# Altium PCB Prototype_REV1.PcbDoc
Units mm, origin at the board's own origin, x right, y up, seen from the top; angles counter-clockwise.
Board outline 90 x 25 mm, 2 copper layers (Top Layer, Bottom Layer); 121 components, 71 nets, 416 pads, 3 vias.
Unrouted connection lines stored in the file: 229.
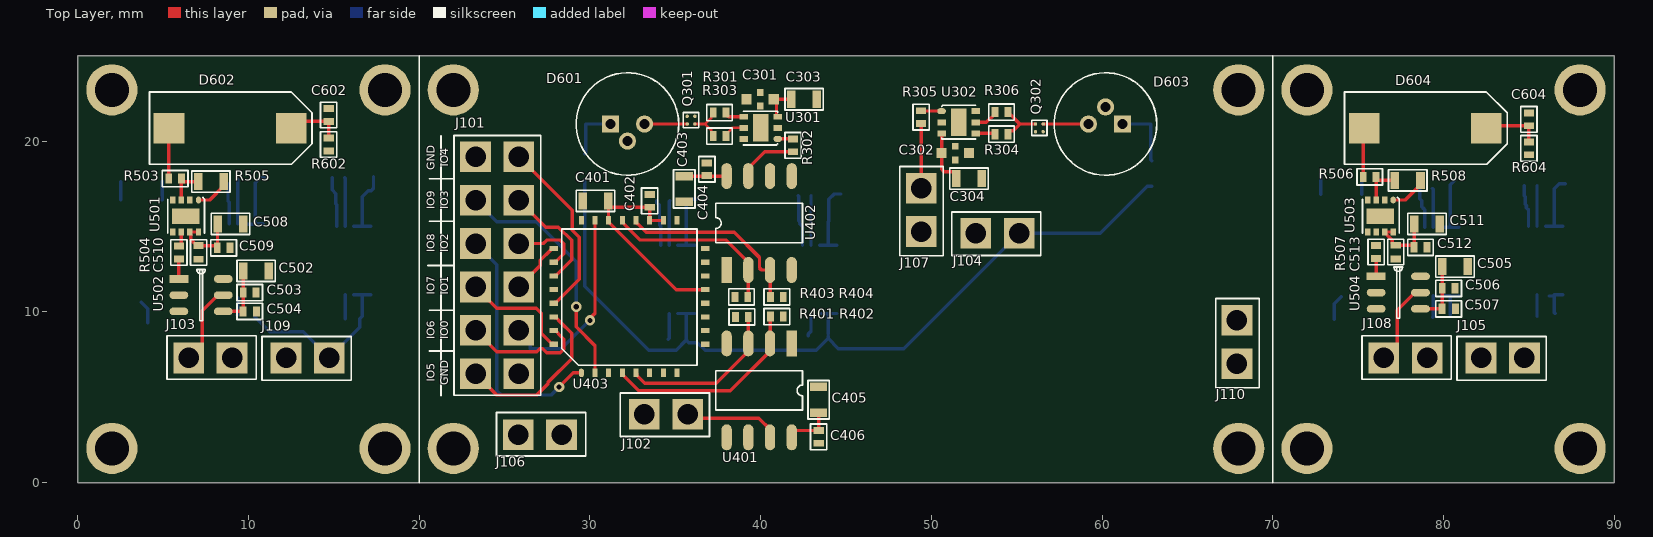
[diagram p0: Top Layer view]
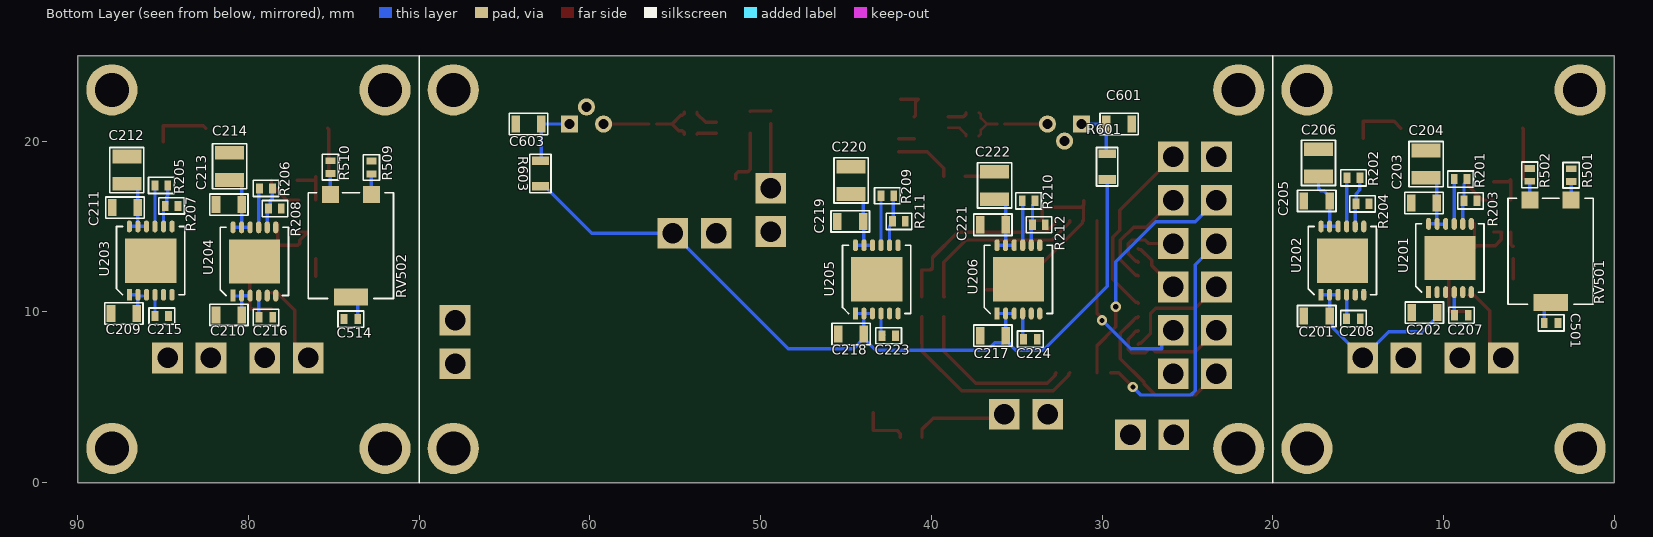
[diagram p1: Bottom Layer view, seen from below]

## Layer stack, top to bottom
Top Solder: solder mask 0.0102, Solder Resist, Dk 3.5
Top Layer: signal copper 0.0356
Dielectric 1: dielectric 0.32, FR-4, Dk 4.8
Bottom Layer: signal copper 0.0356
Bottom Solder: solder mask 0.0102, Solder Resist, Dk 3.5

## Board outline
0,0 90,0 90,25 0,25

## Design rules (kind name [scope] priority, off if disabled: settings)
Clearance Clearance_1 [All] p1: gap=0.254 ignorepadtopadclearanceinfootprint=FALSE
Clearance [All] p2: gap=0.254 ignorepadtopadclearanceinfootprint=FALSE
PolygonConnect [All] p1: connectstyle=Relief reliefconductorwidth=0.254 reliefentries=4 polygonreliefangle="90 Angle" airgapwidth=0.254
RoutingVias [All] p1: holewidth=0.3 width=0.6 viastyle="Through Hole" minholewidth=0.1 minwidth=0.3 maxholewidth=0.6 maxwidth=0.7
SolderMaskExpansion [All] p1: expansion=0 istentingtop=FALSE
SupplyNets "Schematic Supply Nets_5" [InNet('3V3')] p1: voltage=0.000
SupplyNets "Schematic Supply Nets_4" [InNet('Vvar')] p2: voltage=0.000
SupplyNets "Schematic Supply Nets_3" [InNet('5VGaN')] p3: voltage=0.000
SupplyNets "Schematic Supply Nets_2" [InNet('Vin')] p4: voltage=0.000
SupplyNets "Schematic Supply Nets_1" [InNet('5V')] p5: voltage=0.000
SupplyNets "Schematic Supply Nets" [InNet('GND')] p6: voltage=0.000
Width [All] p1: maxlimit=1 minlimit=0.1 preferedwidth=0.2
30 further rules are at their usual default settings.

## Classes and differential pairs
component class Time_Delay: C401 C402 C403 C404 C405 C406 R401 R402 R403 R404 U401 U402 U403
component class Power_Supply: C202 C213 C214 C215 C216 C217 C218 C219 C220 C221 C222 C223 C224 R201 R207 R208 R209 R210 R211 R212 U201 U204 U205 U206
component class Light_Detection: C501 C502 C503 C504 C505 C506 C507 C508 C509 C510 C511 C512 C513 C514 R501 R502 R503 R504 R505 R506 R507 R508 R509 R510 RV501 RV502 U501 U502 U503 U504
component class Laser_System: C601 C602 C603 C604 D601 D602 D603 D604 R601 R602 R603 R604
component class Laser_Driver: C301 C302 C303 C304 Q301 Q302 R301 R302 R303 R304 R305 R306 U301 U302
component class Inputs_Outputs: J101 J102 J103 J104 J107 J109 J110

## Components (designator, comment, footprint, x,y, rotation, side; value= is the part's Value field where it differs from the comment)
C201 "1uF" "1uF 0603" 17.425,9.75 r180 bottom
C202 "1uF" "1uF 0603" 11.125,9.95 r180 bottom
C203 "1uF" "1uF 0603" 11.15,16.375 r180 bottom
C204 "10uF" "10uF 0805" 11.025,18.65 r270 bottom
C205 "1uF" "1uF 0603" 17.425,16.5 r180 bottom
C206 "10uF" "10uF 0805" 17.325,18.725 r270 bottom
C207 "10nF" "10nF 0402" 8.95,9.8 r0 bottom
C208 "10nF" "10nF 0402" 15.275,9.6 r0 bottom
C209 "1uF" "1uF 0603" 87.3,9.9 r180 bottom
C210 "1uF" "1uF 0603" 81.15,9.825 r180 bottom
C211 "1uF" "1uF 0603" 87.225,16.1 r180 bottom
C212 "10uF" "10uF 0805" 87.125,18.3 r270 bottom
C213 "1uF" "1uF 0603" 81.15,16.275 r180 bottom
C214 "10uF" "10uF 0805" 81.1,18.525 r270 bottom
C215 "10nF" "10nF 0402" 85.075,9.75 r0 bottom
C216 "10nF" "10nF 0402" 78.975,9.675 r0 bottom
C217 "1uF" "1uF 0603" 36.4,8.6 r180 bottom
C218 "1uF" "1uF 0603" 44.7,8.7 r180 bottom
C219 "1uF" "1uF 0603" 44.75,15.3 r180 bottom
C220 "10uF" "10uF 0805" 44.7,17.7 r270 bottom
C221 "1uF" "1uF 0603" 36.4,15.1 r180 bottom
C222 "10uF" "10uF 0805" 36.3,17.4 r270 bottom
C223 "10nF" "10nF 0402" 42.5,8.6 r0 bottom
C224 "10nF" "10nF 0402" 34.2,8.4 r0 bottom
C301 "100n FT" "100n FT 0603" 39.175,22.45 r0 top
C302 "100n FT" "100n FT 0603" 52.2,19.3 r180 top
C303 "1uF" "1uF 0603" 42.55,22.45 r180 top
C304 "1uF" "1uF 0603" 52.2,17.8 r180 top
C401 "1uF" "1uF 0603" 30.325,16.5 r0 top
C402 "100nF" "100nF 0402" 33.5,16.5 r270 top
C403 "1uF" "1uF 0603" 35.525,17.2 r90 top
C404 "100nF" "100nF 0402" 36.85,18.35 r270 top
C405 "1uF" "1uF 0603" 43.4,4.85 r270 top
C406 "100nF" "100nF 0402" 43.4,2.675 r90 top
C501 "10nF" "10nF 0402" 3.7,9.35 r0 bottom
C502 "1uF" "1uF 0603" 10.45,12.4 r180 top locked
C503 "100nF" "100nF 0402" 10.075,11.125 r180 top locked
C504 "10nF" "10nF 0402" 10.075,10.025 r180 top locked
C505 "1uF" "1uF 0603" 80.675,12.65 r180 top locked
C506 "100nF" "100nF 0402" 80.3,11.375 r180 top locked
C507 "10nF" "10nF 0402" 80.3,10.175 r180 top locked
C508 "1uF" "1uF 0603" 8.95,15.15 r180 top locked
C509 "100nF" "100nF 0402" 8.55,13.75 r180 top locked
C510 "10nF" "10nF 0402" 7.075,13.475 r90 top locked
C511 "1uF" "1uF 0603" 79.025,15.15 r180 top locked
C512 "100nF" "100nF 0402" 78.65,13.775 r180 top locked
C513 "10nF" "10nF 0402" 77.2,13.5 r90 top locked
C514 "10nF" "10nF 0402" 74,9.575 r180 bottom
C601 "2.2nF" "2.2nF 0603" 29,21 r0 bottom
C602 "100nF" "100nF 0402" 14.7,21.525 r270 top
C603 "2.2nF" "2.2nF 0603" 63.6,21 r180 bottom
C604 "100nF" "100nF 0402" 85,21.275 r270 top
D601 "PLT5 450GB" "PLT5 450GB" 31.2,21 r0 top
D602 "VBP104S" VBP104S 8.925,20.75 r0 top locked
D603 "PLT5 450GB" "PLT5 450GB" 61.2,21 r180 top
D604 "VBP104S" VBP104S 78.925,20.75 r0 top locked
J101 "Spikelinis conectorius" "12PIN HEADER STRIP" 25.84,20.33 r180 top
J102 "Spikelinis conectorius" "2Pin header strip" 35.725,4 r270 top
J103 "Spikelinis conectorius" "2Pin header strip" 6.5,7.3 r90 top locked
J104 "Spikelinis conectorius" "2Pin header strip" 55.14,14.6 r270 top
J105 "Spikelinis conectorius" "2Pin header strip" 84.74,7.3 r270 top locked
J106 "Spikelinis conectorius" "2Pin header strip" 25.8,2.8 r90 top
J107 "Spikelinis conectorius" "2Pin header strip" 49.4,17.24 r0 top
J108 "Spikelinis conectorius" "2Pin header strip" 76.5,7.3 r90 top locked
J109 "Spikelinis conectorius" "2Pin header strip" 14.74,7.3 r270 top locked
J110 "Spikelinis conectorius" "2Pin header strip" 67.9,9.5 r0 top
Q301 "EPC2036" EPC2036 36.15,21 r180 top
Q302 "EPC2036" EPC2036 56.1,21 r0 top
R201 "47K5" "47.5k 0402" 9,17.775 r0 bottom
R202 "23K2" "23.2k 0402" 15.275,17.85 r180 bottom
R203 "15k" "15k 0402" 8.425,16.5 r0 bottom
R204 "13K3" "13k3 0402" 14.75,16.325 r0 bottom
R205 "47K5" "47.5k 0402" 85.1,17.4 r0 bottom
R206 "23K2" "23.2k 0402" 78.975,17.225 r180 bottom
R207 "15k" "15k 0402" 84.5,16.2 r0 bottom
R208 "13K3" "13k3 0402" 78.45,16.05 r0 bottom
R209 "47K5" "47.5k 0402" 42.575,16.8 r0 bottom
R210 "23K2" "23.2k 0402" 34.3,16.5 r180 bottom
R211 "15k" "15k 0402" 41.9,15.3 r0 bottom
R212 "13K3" "13k3 0402" 33.7,15.1 r0 bottom
R301 "2R2" "2R2 0402" 37.6,21.675 r180 top
R302 "22R" "22R 0402" 41.9,19.75 r270 top
R303 "1R" "1R 0402" 37.6,20.3 r180 top
R304 "2R2" "2R2 0402" 54.1,20.4 r0 top
R305 "22R" "22R 0402" 49.4,21.4 r270 top
R306 "1R" "1R 0402" 54.1,21.7 r0 top
R401 "200R" "200R 0402" 38.9,9.7 r0 top
R402 "200R" "200R 0402" 40.95,9.725 r180 top
R403 "200R" "200R 0402" 38.875,10.875 r0 top
R404 "200R" "200R 0402" 40.95,10.875 r180 top
R501 "100R" "100R 0402" 2.525,18 r270 bottom
R502 "3K3" "3k3 0402" 4.95,18.025 r90 bottom
R503 "10R" "10R 0402" 5.7,17.8 r0 top locked
R504 "100R" "100R 0402" 5.925,13.475 r270 top locked
R505 "1K" "1k 0603" 7.8,17.625 r0 top locked
R506 "10R" "10R 0402" 75.671,17.897 r0 top locked
R507 "100R" "100R 0402" 76.05,13.5 r270 top locked
R508 "1K" "1k 0603" 77.9,17.7 r0 top locked
R509 "100R" "100R 0402" 72.8,18.45 r270 bottom
R510 "3K3" "3k3 0402" 75.2,18.475 r90 bottom
R601 "1K" "1k 0603" 29.7,18.5 r270 bottom
R602 "100R" "100R 0402" 14.7,19.8 r90 top
R603 "1K" "1k 0603" 62.9,18.1 r270 bottom
R604 "100R" "100R 0402" 85,19.575 r270 top
RV501 "5K TRIM" "5K TRIM" 3.725,13.55 r0 bottom
RV502 "5K TRIM" "5K TRIM" 74,13.875 r0 bottom
U201 "LP38798SD-ADJ/NOPB" LP38798SD-ADJ/NOPB 10.875,11.15 r90 bottom
U202 "LP38798SD-ADJ/NOPB" LP38798SD-ADJ/NOPB 17.175,11 r90 bottom
U203 "LP38798SD-ADJ/NOPB" LP38798SD-ADJ/NOPB 86.975,11 r90 bottom
U204 "LP38798SD-ADJ/NOPB" LP38798SD-ADJ/NOPB 80.9,10.95 r90 bottom
U205 "LP38798SD-ADJ/NOPB" LP38798SD-ADJ/NOPB 44.45,9.9 r90 bottom
U206 "LP38798SD-ADJ/NOPB" LP38798SD-ADJ/NOPB 36.15,9.9 r90 bottom
U301 "LMG1025QDEERQ1" LMG1025QDEERQ1 41,20.125 r180 top
U302 "LMG1025QDEERQ1" LMG1025QDEERQ1 50.6,21.75 r0 top
U401 "MC100EPT20DR2G" MC100EPT20DR2G 41.82,8.15 r270 top
U402 "MC100EPT21DR2G" MC100EPT21DR2G 38.01,12.45 r90 top
U403 "MC100EP195FAG" MC100EP195FAG 29.5,6.425 r90 top
U501 "OPA855IDSGT" OPA855IDSGT 7.075,16.55 r270 top locked
U502 "TLV3501AIDBVT" TLV3501AIDBVT 5.925,11.925 r0 top locked
U503 "OPA855IDSGT" OPA855IDSGT 77.05,16.55 r270 top locked
U504 "TLV3501AIDBVT" TLV3501AIDBVT 76.05,12.075 r0 top locked

## Footprints (in the part's own frame and the unit in brackets; to place one, negate y for a bottom-side part, rotate by r counter-clockwise, add the part's x,y. Pads: shape width x height; smd on the part's side, far side on the other; paste and mask are expansions set on the pad)
"1k 0603" [mm] "ERA-3AEB102V"
  rect 0.5x1 smd: 1(-0.75,0) 2(0.75,0)
  silkscreen extent -1.13,-0.63 1.12,0.63, body extent -0.8,-0.4 0.8,0.4, height 0.46
"1R 0402" [mm] "CRT0402-FZ-1R00GLF"
  rect 0.4x0.6 smd: 1(-0.371,0.003) 2(0.379,0.003)
  silkscreen extent -0.75,-0.47 0.75,0.48, body extent -0.5,-0.25 0.5,0.25, height 0.36
"1uF 0603" [mm] "CGA3E1X7R1E105K080AC"
  rect 0.5x1 smd: 1(-0.75,0) 2(0.75,0)
  silkscreen extent -1.13,-0.63 1.12,0.63, body extent -0.8,-0.4 0.8,0.4, height 0.81
"2.2nF 0603" [mm]
  rect 0.5x1 smd: 1(-0.75,0) 2(0.75,0)
  silkscreen extent -1.13,-0.63 1.12,0.63, body extent -0.87,-0.48 0.87,0.48, height 0.88
"2Pin header strip" [mm]
  rect 1.8x1.8 hole 1.2: 1(0,0) 2(0,-2.54)
  silkscreen extent -1.25,-3.95 1.3,1.28, body extent -1.24,-3.94 1.3,1.26, height 9.28
"2R2 0402" [mm] "CRT0402-FZ-2R00GLF"
  rect 0.4x0.6 smd: 1(-0.371,0.003) 2(0.379,0.003)
  silkscreen extent -0.75,-0.47 0.75,0.48, body extent -0.5,-0.25 0.5,0.25, height 0.36
"3k3 0402" [mm] "ERJ-U02F3301X"
  rect 0.4x0.6 smd: 1(-0.375,0) 2(0.375,0)
  silkscreen extent -0.75,-0.48 0.75,0.48, body extent -0.5,-0.25 0.5,0.25, height 0.36
"5K TRIM" [mm] "3314G-1-502E"
  rect 1x1 smd: 1(-1.2,-3) 3(1.2,-3)
  rect 2x1 smd: 2(0,3)
  silkscreen extent -2.5,-3.1 2.5,3.1, body extent -2.5,-3.1 2.5,3.1, height 2.74
"10nF 0402" [mm] "C0402C103J5RACTU"
  rect 0.4x0.6 smd: 1(-0.4,0) 2(0.4,0)
  silkscreen extent -0.75,-0.48 0.75,0.48, body extent -0.53,-0.27 0.53,0.28, height 0.56
"10R 0402" [mm] "CRT0402-DZ-10R0GLF"
  rect 0.4x0.6 smd: 1(-0.371,0.003) 2(0.379,0.003)
  silkscreen extent -0.75,-0.47 0.75,0.48, body extent -0.5,-0.25 0.5,0.25, height 0.36
"10uF 0805" [mm] "GRJ21BR61E106KE01K"
  rect 0.8x1.7 smd: 1(-0.8,0) 2(0.8,0)
  silkscreen extent -1.33,-1 1.33,1, body extent -1,-0.72 1,0.72, height 1.26
"12PIN HEADER STRIP" [mm] "TSW-112-07-G-S"
  rect 1.8x1.8 hole 1.2: 1(0,13.95) 2(0,11.41) 3(0,8.87) 4(0,6.33) 5(0,3.79) 6(0,1.25) 7(2.54,13.95) 8(2.54,11.41) 9(2.54,8.87) 10(2.54,6.33) 11(2.54,3.79) 12(2.54,1.25)
  silkscreen extent -1.28,0 3.8,15.22
"13k3 0402" [mm] "CRCW040213K3FKED"
  rect 0.4x0.6 smd: 1(-0.375,0) 2(0.375,0)
  silkscreen extent -0.75,-0.48 0.75,0.48, body extent -0.5,-0.25 0.5,0.25, height 0.36
"15k 0402" [mm] "CRCW040215K0FKED"
  rect 0.4x0.6 smd: 1(-0.375,0) 2(0.375,0)
  silkscreen extent -0.75,-0.48 0.75,0.48, body extent -0.5,-0.25 0.5,0.25, height 0.36
"22R 0402" [mm] "ERA-2AKD220X"
  rect 0.4x0.6 smd: 1(-0.375,0) 2(0.375,0)
  silkscreen extent -0.75,-0.48 0.75,0.48, body extent -0.5,-0.25 0.5,0.25, height 0.36
"23.2k 0402" [mm] "CR0402-FX-2322GLF"
  rect 0.4x0.6 smd: 1(-0.375,0) 2(0.375,0)
  silkscreen extent -0.75,-0.48 0.75,0.48, body extent -0.5,-0.25 0.5,0.25, height 0.36
"47.5k 0402" [mm] "CR0402-FX-4752GLF"
  rect 0.4x0.6 smd: 1(-0.375,0) 2(0.375,0)
  silkscreen extent -0.75,-0.48 0.75,0.48, body extent -0.5,-0.25 0.5,0.25, height 0.36
"100n FT 0603" [mm] "NFM18PC104R1C3D"
  rect 0.6x0.6 smd: 1(0,0) 3(1.6,0)
  rect 0.4x0.4 smd: A2(0.8,-0.4) B2(0.8,0.4)
  body extent 0.02,-0.4 1.63,0.4, height 0.61
"100nF 0402" [mm] "C1005X7R1E104K050BB"
  rect 0.4x0.6 smd: 1(-0.375,0) 2(0.375,0)
  silkscreen extent -0.75,-0.48 0.75,0.48, body extent -0.48,-0.25 0.53,0.25, height 0.51
"100R 0402" [mm] "ERA-2VEB1000X"
  rect 0.4x0.6 smd: 1(-0.375,0) 2(0.375,0)
  silkscreen extent -0.75,-0.48 0.75,0.48, body extent -0.5,-0.25 0.5,0.25, height 0.37
"200R 0402" [mm] "ERA-2AED201X"
  rect 0.4x0.6 smd: 1(-0.375,0) 2(0.375,0)
  silkscreen extent -0.75,-0.48 0.75,0.48, body extent -0.5,-0.25 0.5,0.25, height 0.36
EPC2036 [mm]
  round 0.2 smd: 1(0,0) 2(0,-0.45) 3(0.45,0) 4(0.45,-0.45)
  silkscreen extent -0.23,-0.67 0.67,0.23, body extent -0.22,-0.67 0.67,0.22, height 0.93
LMG1025QDEERQ1 [mm]
  oval 0.5x0.35 smd: 1(0,0)
  rect 0.5x0.35 smd: 2(0,-0.65) 3(0,-1.3) 4(2,-1.3) 5(2,-0.65) 6(2,0)
  rect 0.9x1.6 smd: 7(1,-0.65)
  silkscreen extent 0,-1.63 2,0.35, body extent 0,-1.65 2,0.35, height 0.79
LP38798SD-ADJ/NOPB [mm]
  rect 0.7x0.3 smd: 1(0,0)
  oval 0.7x0.3 smd: 2(0,-0.5) 3(0,-1) 4(0,-1.5) 5(0,-2) 6(0,-2.5) 7(4,-2.5) 8(4,-2) 9(4,-1.5) 10(4,-1) 11(4,-0.5) 12(4,0)
  rect 2.6x3 smd: 13(2,-1.25)
  silkscreen extent 0,-3.25 4,0.75, body extent 0,-3.25 4,0.75, height 0.99
MC100EP195FAG [mm]
  oval 0.5x0.3 smd: 1(0,0)
  rect 0.5x0.3 smd: 2(0,-0.8) 3(0,-1.6) 4(0,-2.4) 5(0,-3.2) 6(0,-4) 7(0,-4.8) 8(0,-5.6) 17(8.925,-5.6) 18(8.925,-4.8) 19(8.925,-4) 20(8.925,-3.2) 21(8.925,-2.4) 22(8.925,-1.6) 23(8.925,-0.8) 24(8.925,0)
  rect 0.3x0.5 smd: 9(1.675,-7.25) 10(2.475,-7.25) 11(3.275,-7.25) 12(4.075,-7.25) 13(4.875,-7.25) 14(5.675,-7.25) 15(6.475,-7.25) 16(7.275,-7.25) 25(7.275,1.625) 26(6.475,1.625) 27(5.675,1.625) 28(4.875,1.625) 29(4.075,1.625) 30(3.275,1.625) 31(2.475,1.625) 32(1.675,1.625)
  silkscreen extent 0.45,-6.78 8.42,1.15, body extent -0.03,-7.3 8.98,1.7, height 1.61
MC100EPT20DR2G [mm]
  rect 1.52x0.6 smd: 1(0,0)
  oval 1.52x0.6 smd: 2(0,-1.27) 3(0,-2.54) 4(0,-3.81) 5(5.5,-3.81) 6(5.5,-2.54) 7(5.5,-1.27) 8(5.5,0)
  silkscreen extent 1.59,-4.44 3.91,0.64, body extent -0.22,-4.38 5.77,0.53, height 1.76
MC100EPT21DR2G [mm]
  rect 1.52x0.6 smd: 1(0,0)
  oval 1.52x0.6 smd: 2(0,-1.27) 3(0,-2.54) 4(0,-3.81) 5(5.5,-3.81) 6(5.5,-2.54) 7(5.5,-1.27) 8(5.5,0)
  silkscreen extent 1.59,-4.44 3.91,0.64, body extent -0.22,-4.38 5.77,0.53, height 1.76
OPA855IDSGT [mm]
  oval 0.4x0.32 smd: 1(0,0)
  rect 0.4x0.32 smd: 2(0,-0.5) 3(0,-1) 4(0,-1.5) 5(1.875,-1.5) 6(1.875,-1) 7(1.875,-0.5) 8(1.875,0)
  rect 0.9x1.6 smd: 9(0.95,-0.75)
  silkscreen extent -0.15,-1.8 1.95,0.35, body extent -0.05,-1.75 1.95,0.25, height 0.79
"PLT5 450GB" [mm]
  rect 1x1 / inner rect 1.8x1.8 / far side rect 1x1 hole 0.6: 1(0,0)
  round 1 / inner rect 1.8x1.8 / far side round 1 hole 0.6: 2(1,-1) 3(2,0)
  silkscreen extent -2,-3 4,3, body extent -1.78,-2.73 3.75,2.78, height 3.51
TLV3501AIDBVT [mm]
  rect 1.1x0.45 smd: 1(0,0)
  oval 1.1x0.45 smd: 2(0,-0.95) 3(0,-1.9) 4(2.6,-1.9) 5(2.6,-0.95) 6(2.6,0)
  silkscreen extent 1.05,-2.45 1.55,0.55, body extent 0,-2.4 2.8,0.5, height 1.11
VBP104S [mm]
  rect 1.8x1.8 smd: 1(-3.575,0) 2(3.575,0)
  silkscreen extent -4.72,-2.1 4.8,2.12, body extent -3.45,-1.94 2.95,1.96, height 1.31

## Part data
C201 C202 C203 C205 C209 C210 C211 C213 C217 C218 C219 C221 C303 C304 C401 C403 C405 C502 C505 C508 C511: library part "1uF 0603", "CGA3E1X7R1E105K080AC"
C204 C206 C212 C214 C220 C222: library part "10uF 0805", "GRJ21BR61E106KE01K"
C207 C208 C215 C216 C223 C224 C501 C504 C507 C510 C513 C514: library part "10nF 0402", "C0402C103J5RACTU"
C301 C302: library part "100n 0603 FT", "NFM18PC104R1C3D"
C402 C404 C406 C503 C506 C509 C512 C602 C604: library part "100n 0402", "C1005X7R1E104K050BB"
C601 C603: library part "2.2nF 0603", "C0603X222K1REC7411"
D601 D603: "Lazeris"
D602 D604: "FotoDiodas"
J101: library part 12PinConnector, "TSW-112-07-G-S"
J102 J103 J104 J105 J106 J107 J108 J109 J110: library part 2PinConnector
R201 R205 R209: library part "47K5 0402", "CR0402-FX-4752GLF"
R202 R206 R210: library part "23K2 0402", "CR0402-FX-2322GLF"
R203 R207 R211: library part "15k 0402", "CRCW040215K0FKED"
R204 R208 R212: library part "13K3 0402", "CRCW040213K3FKED"
R301 R304: library part "2R2 0402", "CRT0402-FZ-2R00GLF"
R302 R305: library part "22R 0402", "ERA-2AKD220X"
R303 R306: library part "1R 0402", "CRT0402-FZ-1R00GLF"
R401 R402 R403 R404: library part "200R 0402", "ERA-2AED201X"
R501 R504 R507 R509 R602 R604: library part "100R 0402", "ERA-2VEB1000X"
R502 R510: library part "3K3 0402", "ERJ-U02F3301X"
R503 R506: library part "10R 0402", "CRT0402-DZ-10R0GLF"
R505 R508 R601 R603: library part "1K 0603", "ERA-3AEB102V"
RV501 RV502: "3314G-1-502E"
U201 U202 U203 U204 U205 U206: "input 3-20V output 1.5-5V"
U301 U302: "GaN Driver"
U501 U503: "OP ampas"
U502 U504: "Comparatorius"

## Free pads (board coordinates)
  round 3 hole 2: 2(2,2) 2(2,23) 2(18,2) 2(18,23) 2(22,2) 2(22,23) 2(68,2) 2(68,23) 2(72,2) 2(72,23) 2(88,2) 2(88,23)

## Via types
v1: diameter 0.6, hole 0.3, Top Layer to Bottom Layer, 3 vias

## Nets (pads, with @x,y where several pads share a name; then routed paths per layer and width w, separated by ;. In a path a pad name is that pad's centre, name@x,y a point inside that pad or via, vN(x,y) a via of type N, cw(c..) or ccw(c..) an arc to the next point about the centre after c; other vN are vias at no path point)
3V3: C205.2 C206.2 C213.2 C214.2 C221.2 C222.2 C401.2 C402.2 C403.2 C404.2 C405.2 C406.2 C502.2 C503.2 C504.2 C505.2 C506.2 C507.2 R501.1 R509.1 U202.10 U202.11 U202.12 U204.10 U204.11 U204.12 U206.10 U206.11 U206.12 U401.8 U402.8 U403.13 U403.18 U403.19 U403.22 U501.4 U502.4 U503.4 U504.4 | length 37.8
  Top Layer w0.2: U502.4 C504.2 9.687,10.038 9.687,11.112 C503.2 C502.2 ; U403.18 U403.19 C402.2 31.225,16.125 31.075,16.275 C401.2 31.087,16.488 31.087,15.362 U403.22 31.15,15.3 31.15,15.199 35.049,11.3 U403.13 ; C403.2 U402.8 ; U401.8 41.82,2.865 42.005,3.05 C406.2 C405.2 ; U504.4 C507.2 79.912,10.187 79.912,11.362 C506.2 C505.2
  Bottom Layer w0.2: U202.10 U202.11 ; U202.12 U202.11 ; C206.2 17.325,17.225 17.184,17.084 17.009,17.084 16.675,16.75 C205.2 U202.11 ; U206.10 U206.11 ; U206.12 U206.11 ; C222.2 35.95,16.6 35.65,16.3 C221.2 U206.11 ; U204.10 U204.11 ; C214.2@80.65,17.7 80.4,17.45 C213.2 U204.11 ; U204.12 U204.11
5V: C203.2 C204.2 C211.2 C212.2 C508.2 C509.2 C510.2 C511.2 C512.2 C513.2 R602.1 R604.2 U201.10 U201.11 U201.12 U203.10 U203.11 U203.12 U501.7 U501.8 U503.7 U503.8 | length 16.4
  Top Layer w0.2: U501.8 U501.7 6.615,14.635 6.615,14.235 6.975,13.875 C510.2 8.075,13.875 8.175,13.775 C509.2 8.187,13.762 8.187,15.138 C508.2 ; U503.7@76.55,14.635 77,14.185 77,14 77.1,13.9 C513.2 78.175,13.9 78.275,13.8 C512.2 C511.2 ; U503.7 U503.8
  Bottom Layer w0.2: U201.10 9.9,15.125 10.35,15.125 U201.11 ; U201.12 10.4,15.15 10.388,15.162 10.388,16.363 C203.2 10.4,17.55 10.7,17.85 C204.2 ; U203.10 U203.11 ; U203.12 U203.11 ; C212.2 86.775,17.5 86.475,17.2 C211.2 U203.11
5VGaN: C219.2 C220.2 C301.3 C302.3 C303.2 C304.2 U205.10 U205.11 U205.12 U301.3 U302.3 | length 10
  Top Layer w0.2: U301.3 40.927,21.498 40.927,22.298 C301.3 C303.2 ; U302.3 C302.3 50.6,18.341 50.741,18.2 51.3,18.2 51.45,18.05 C304.2
  Bottom Layer w0.2: U205.10 U205.11 ; U205.12 U205.11 ; C220.2 44.3,16.9 44,16.6 C219.2 43.969,15.269 43.969,13.919 U205.11
DelayLaserAnode: C601.2 D601.1 R601.1 | length 3.2
  Bottom Layer w0.2: R601.1 29.75,19.3 C601.2 D601.1
EtalonLaserAnode: C603.2 D603.1 R603.1 | length 3.8
  Bottom Layer w0.2: D603.1 C603.2 62.85,18.9 R603.1
GND: C201.1 C202.1 C203.1 C204.1 C205.1 C206.1 C207.1 C208.1 C209.1 C210.1 C211.1 C212.1 C213.1 C214.1 C215.1 C216.1 C217.1 C218.1 C219.1 C220.1 C221.1 C222.1 C223.1 C224.1 C301.1 C301.A2 C301.B2 C302.1 C302.A2 C302.B2 C303.1 C304.1 C401.1 C402.1 C403.1 C404.1 C405.1 C406.1 C501.1 C502.1 C503.1 C504.1 C505.1 C506.1 C507.1 C508.1 C509.1 C510.1 C511.1 C512.1 C513.1 C514.1 C601.1 C602.1 C603.1 C604.1 D601.2 D603.2 J101.1 J101.12 J102.2 J103.2 J104.2 J105.2 J106.1 J106.2 J107.2 J108.2 J109.2 J110.1 J110.2 pad.2 Q301.2 Q301.4 Q302.2 Q302.4 R203.1 R204.1 R207.1 R208.1 R211.1 R212.1 R401.1 R402.1 R403.1 R404.1 R502.2 R510.2 U201.6 U201.7 U201.13 U202.6 U202.7 U202.13 U203.6 U203.7 U203.13 U204.6 U204.7 U204.13 U205.6 U205.7 U205.13 U206.6 U206.7 U206.13 U301.2 U301.6 U301.7 U302.2 U302.6 U302.7 U401.5 U402.5 U403.9 U403.24 U403.28 U501.5 U501.9 U502.2 U502.6 U503.5 U503.9 U504.2 U504.6
NetC207_2: C207.2 U201.4 | length 1
  Bottom Layer w0.2: C207.2 9.375,9.825 9.375,10.746 9.379,10.75 U201.4@9.379,10.825
NetC208_2: C208.2 U202.4 | length 1.4
  Bottom Layer w0.2: C208.2 U202.4
NetC215_2: C215.2 U203.4 | length 1.2
  Bottom Layer w0.2: C215.2 U203.4
NetC216_2: C216.2 U204.4 | length 1.3
  Bottom Layer w0.2: C216.2 79.4,9.7 U204.4
NetC223_2: C223.2 U205.4 | length 1.4
  Bottom Layer w0.2: C223.2@42.8,8.6 42.8,8.7 42.95,8.85 U205.4
NetC224_2: C224.2 U206.4 | length 1.5
  Bottom Layer w0.2: C224.2 34.65,8.45 U206.4
NetC602_2: C602.2 D602.2 R602.2 | length 3.3
  Top Layer w0.2: D602.2 12.9,21.15 C602.2 R602.2
NetC604_2: C604.2 D604.2 R604.1 | length 3.5
  Top Layer w0.2: D604.2 82.65,20.9 C604.2 R604.1
NetD601_3: D601.3 Q301.3 | length 2.5
  Top Layer w0.2: D601.3 Q301.3
NetD602_1: D602.1 R503.1 | length 3
  Top Layer w0.2: R503.1 5.329,20.729 D602.1
NetD603_3: D603.3 Q302.3 | length 2.6
  Top Layer w0.2: Q302.3 D603.3
NetD604_1: D604.1 R506.1 | length 2.9
  Top Layer w0.2: R506.1 75.3,20.7 D604.1
NetJ101_2: J101.2 U403.23 | length 11.5
  Top Layer w0.2: v1(30,9.5) 30,9.608 30.3,9.908 U403.23
  Bottom Layer w0.2: J101.2 26.5,8.26 26.5,7.834 28.334,7.834 v1(30,9.5)
NetJ101_3: J101.3 U403.25 | length 3.1
  Top Layer w0.2: J101.3 27.094,12.714 27.094,13.02 27.724,13.65 27.825,13.65 U403.25
NetJ101_4: J101.4 U403.26 | length 4.2
  Top Layer w0.2: J101.4 27.274,14 27.478,14.204 28.272,14.204 28.479,13.997 28.479,13.403 28.026,12.95 27.925,12.95 U403.26
NetJ101_5: J101.5 U403.27 | length 6.7
  Top Layer w0.2: J101.5 27.418,14.962 28.155,14.962 28.933,14.185 28.933,13.057 28.026,12.15 27.925,12.15 U403.27
NetJ101_6: J101.6 U403.29 | length 10.7
  Top Layer w0.2: J101.6 28.971,15.949 28.971,14.789 29.387,14.373 29.387,11.911 28.026,10.55 27.925,10.55 U403.29
NetJ101_7: J101.7 U403.30 | length 10
  Top Layer w0.2: J101.7 24.554,5.126 26.887,5.126 27.546,5.785 27.546,5.871 28.933,7.258 28.933,8.743 28.272,9.404 28.025,9.65 27.925,9.65 U403.30
NetJ101_8: J101.8 U403.31 | length 7.4
  Top Layer w0.2: J101.8 24.554,7.666 26.887,7.666 27.065,7.844 27.23,7.844 27.478,7.596 28.272,7.596 28.479,7.803 28.479,8.397 28.272,8.604 28.025,8.85 27.925,8.85 U403.31
NetJ101_9: J101.9 U403.32 | length 6.7
  Top Layer w0.2: J101.9 24.554,10.206 26.855,10.206 27.167,9.894 27.167,8.708 27.724,8.15 27.825,8.15 U403.32
NetJ101_10: J101.10 U403.1 | length 14.7
  Top Layer w0.2: v1(28.2,5.6) 29.025,6.425 U403.1
  Bottom Layer w0.2: J101.10 24.554,12.746 24.554,5.365 24.793,5.126 27.726,5.126 v1(28.2,5.6)
NetJ101_11: J101.11 U403.2 | length 14.4
  Top Layer w0.2: v1(29.2,10.3) 29.2,9.118 30.3,8.018 U403.2
  Bottom Layer w0.2: J101.11 24.554,15.286 26.855,15.286 29.2,12.941 v1(29.2,10.3)
NetJ102_1: J102.1 U401.7 | length 5.7
  Top Layer w0.2: J102.1@35.725,3.5 35.989,3.764 39.896,3.764 40.55,3.11 U401.7
NetJ103_1: J103.1 U502.5 | length 4.7
  Top Layer w0.2: J103.1 7.3,8.1 7.3,10.075 8.2,10.975 U502.5
NetJ107_1: J107.1 R305.2 | length 3.8
  Top Layer w0.2: J107.1 R305.2
NetJ108_1: J108.1 U504.5 | length 4.9
  Top Layer w0.2: J108.1 77.3,8.1 77.3,10.1 78.325,11.125 U504.5
NetQ301_1: Q301.1 R301.2 R303.2 | length 2.4
  Top Layer w0.15: Q301.1 36.756,21 ; R303.2 37.096,20.422 37.096,20.653 36.753,20.996 37.096,21.34 37.096,21.547 R301.2
NetQ302_1: Q302.1 R304.2 R306.2 | length 3
  Top Layer w0.2: R304.2 54.479,20.503 54.579,20.603 54.785,20.603 55.168,20.986 ; R306.2 54.479,21.603 54.579,21.503 54.679,21.503 55.182,21 Q302.1
NetR201_1: R201.1 R203.2 U201.8 | length 2.7
  Bottom Layer w0.2: R201.1 8.625,17.675 8.8,17.5 R203.2 8.875,16.425 U201.8
NetR201_2: R201.2 U201.9 | length 2.6
  Bottom Layer w0.2: U201.9 9.375,16.024 R201.2
NetR202_1: R202.1 U202.9 | length 2.9
  Bottom Layer w0.2: R202.1 15.679,17.821 15.679,15.878 15.675,15.874 U202.9
NetR202_2: R202.2 R204.2 U202.8 | length 3
  Bottom Layer w0.2: R202.2 14.9,17.15 15.125,16.925 R204.2 15.175,16.275 U202.8
NetR205_1: R205.1 R207.2 U203.8 | length 2.5
  Bottom Layer w0.2: R205.1 84.725,16.8 84.775,16.75 84.775,16.3 R207.2 ; R207.2@84.85,16.2 84.85,16.1 84.975,15.975 U203.8
NetR205_2: R205.2 U203.9 | length 2.4
  Bottom Layer w0.2: U203.9 R205.2
NetR206_1: R206.1 U204.9 | length 2.3
  Bottom Layer w0.2: R206.1 79.4,17.175 U204.9
NetR206_2: R206.2 R208.2 U204.8 | length 2.4
  Bottom Layer w0.2: R206.2 78.6,16.625 78.725,16.5 78.725,16.15 R208.2 78.9,15.975 U204.8
NetR209_1: R209.1 R211.2 U205.8 | length 2.9
  Bottom Layer w0.2: R209.1 42.237,16.762 42.237,15.338 R211.2 ; R211.2@42.275,15.2 42.45,15.025 U205.8
NetR209_2: R209.2 U205.9 | length 2.9
  Bottom Layer w0.2: U205.9 R209.2
NetR210_1: R210.1 U206.9 | length 2.6
  Bottom Layer w0.2: U206.9 34.65,16.475 R210.1
NetR210_2: R210.2 R212.2 U206.8 | length 2.7
  Bottom Layer w0.2: R210.2 33.925,16.4 34.075,16.25 R212.2 34.15,15.025 U206.8
NetR301_1: R301.1 U301.4 | length 1.2
  Top Layer w0.2: R301.1 37.971,21.572 38.118,21.425 U301.4
NetR302_1: R302.1 U301.1 | length 0.9
  Top Layer w0.2: U301.1 R302.1
NetR302_2: R302.2 U402.7 | length 3.5
  Top Layer w0.2: U402.7 39.28,18.41 40.245,19.375 R302.2
NetR303_1: R303.1 U301.5 | length 1.3
  Top Layer w0.15: R303.1 37.971,20.397 38.349,20.775 U301.5
NetR304_1: R304.1 U302.4 | length 1.1
  Top Layer w0.2: U302.4 53.682,20.45 R304.1
NetR305_1: R305.1 U302.1 | length 1.2
  Top Layer w0.2: R305.1 49.412,21.763 50.587,21.763 U302.1
NetR306_1: R306.1 U302.5 | length 1.4
  Top Layer w0.2: U302.5 53.226,21.1 53.729,21.603 R306.1
NetR401_2: R401.2 U401.3 U403.5 | length 9.7
  Top Layer w0.2: U403.5 32.75,6.375 32.75,6.274 33.203,5.821 37.411,5.821 39.28,7.69 U401.3 39.277,8.152 39.277,9.698 R401.2
NetR402_2: R402.2 U401.2 U403.4 | length 12.2
  Top Layer w0.2: U403.4 31.95,6.375 31.95,6.274 32.857,5.367 38.227,5.367 40.55,7.69 U401.2 40.562,8.162 40.562,9.713 R402.2
NetR403_2: R403.2 U402.2 U403.21 | length 10.5
  Top Layer w0.2: U403.21 31.9,15.25 32.196,14.954 ; 32.196,14.953 32.945,14.204 37.986,14.204 39.28,12.91 U402.2 39.265,12.435 39.265,10.89 R403.2
NetR404_2: R404.2 U402.3 U403.20 | length 11.1
  Top Layer w0.2: U403.20 32.7,15.25 32.996,14.954 ; 32.996,14.953 33.291,14.658 38.457,14.658 39.934,13.181 39.934,12.567 40.051,12.45 U402.3 40.562,12.438 40.562,10.887 R404.2
NetR501_2: R501.2 RV501.1 | length 1.1
  Bottom Layer w0.2: RV501.1 R501.2
NetR502_1: R502.1 RV501.3 | length 1.1
  Bottom Layer w0.2: RV501.3 4.95,16.575 R502.1
NetR503_2: R503.2 R505.1 U501.3 | length 2.2
  Top Layer w0.2: U501.3 6.075,17.721 6.079,17.725 6.179,17.625 R505.1
NetR504_1: R504.1 U501.6 | length 0.9
  Top Layer w0.2: R504.1 5.975,13.85 6.075,13.95 U501.6
NetR504_2: R504.2 U502.1 | length 1.2
  Top Layer w0.2: U502.1 R504.2
NetR505_2: R505.2 U501.1 | length 2.1
  Top Layer w0.2: U501.1 7.725,16.55 8.55,17.375 R505.2
NetR506_2: R506.2 R508.1 U503.3 | length 2.6
  Top Layer w0.2: U503.3 R506.2 76.05,17.8 76.15,17.7 R508.1
NetR507_1: R507.1 U503.6
NetR507_2: R507.2 U504.1 | length 1.1
  Top Layer w0.2: U504.1 R507.2
NetR508_2: R508.2 U503.1 | length 2.2
  Top Layer w0.2: U503.1 77.75,16.55 78.65,17.45 R508.2
NetR509_2: R509.2 RV502.1 | length 1.2
  Bottom Layer w0.2: RV502.1 R509.2
NetR510_1: R510.1 RV502.3 | length 1.2
  Bottom Layer w0.2: RV502.3 R510.1
Vin: C201.2 C202.2 C209.2 C210.2 C217.2 C218.2 J104.1 J105.1 J109.1 R601.2 R603.2 U201.1 U201.2 U201.3 U202.1 U202.2 U202.3 U203.1 U203.2 U203.3 U204.1 U204.2 U204.3 U205.1 U205.2 U205.3 U206.1 U206.2 U206.3 | length 66.1
  Bottom Layer w0.2: C202.2 10.375,9.7 11.25,8.825 13.215,8.825 J109.1 16.525,9.085 16.525,9.6 C201.2 U202.2 ; U202.3 U202.2 ; U202.1 U202.2 ; R601.2 29.7,11.499 33.453,7.746 35.046,7.746 C217.2@35.65,8.35 ; U206.3 U206.2 ; U206.1 U206.2 ; U205.3 U205.2 ; C218.2@43.95,8.575 C218.2@43.95,8.45 ; C218.2 U205.2 ; U205.1 U205.2 ; R603.2 62.65,17.35 59.9,14.6 J104.1 48.386,7.846 44.554,7.846 C218.2@43.95,8.45 ; U204.3 U204.2 C210.2 ; U204.2@80.375,10.925 80.875,10.925 U204.1 ; 86.175,10.925 86.429,10.925 86.475,10.971 U203.2 ; C209.2 86.494,9.956 86.494,10.981 U203.2 ; U203.1 U203.2 ; C217.2@35.65,8.35 35.8,8.2 36.299,8.2 36.753,7.746 43.246,7.746 C218.2@43.95,8.45 ; C217.2@35.65,8.35 C217.2 U206.2
Vvar: C501.2 C514.2 RV501.2 RV502.2 U502.3 U504.3 | length 2.8
  Bottom Layer w0.2: RV501.2 4.1,10.175 C501.2 ; C514.2 73.6,10.475 RV502.2
pads on no net: U201.5 U202.5 U203.5 U204.5 U205.5 U206.5 U401.1 U401.4 U401.6 U402.1 U402.4 U402.6 U403.3 U403.6 U403.7 U403.8 U403.10 U403.11 U403.12 U403.14 U403.15 U403.16 U403.17 U501.2 U503.2

## Silkscreen, mask and mechanical layers (free items; w line width, h text height)
Top Overlay:
  lines w0.1: 20,0 20,25 ; 20.518,12.718 22.04,12.718 ; 20.6,7.7 22,7.7 ; 20.6,10.1 22,10.1 ; 20.6,15.3 22,15.3 ; 20.6,17.8 22,17.8 ; 21.275,5.1 21.275,20.3 ; 70,0 70,25
  text "IO4" at 21.892,18.5 h0.8 r90
  text "GND" at 21.092,18.3 h0.8 r90
  text "IO9" at 21.092,16 h0.8 r90
  text "IO3" at 21.891,16 h0.8 r90
  text "IO8" at 21.092,13.5 h0.8 r90
  text "IO2" at 21.892,13.5 h0.8 r90
  text "IO7" at 21.092,11 h0.8 r90
  text "IO1" at 21.892,11 h0.8 r90
  text "IO6" at 21.092,8.4 h0.8 r90
  text "IO0" at 21.892,8.4 h0.8 r90
  text "IO5" at 21.092,5.9 h0.8 r90
  text "GND" at 21.892,5.7 h0.8 r90
Bottom Overlay:
  lines w0.1: 20,0 20,25 ; 70,0 70,25